# Altium PCB PWR Board 10A.PcbDoc (part 6 of 10)
Units mm, origin at the board's own origin, x right, y up, seen from the top; angles counter-clockwise.
Board outline 355 x 325 mm, 4 copper layers (Top Layer, Layer 1, Layer 2, Bottom Layer), stack 1.636 mm thick; 617 components, 308 nets, 1518 pads, 1199 vias.
Unrouted connection lines stored in the file: 361.
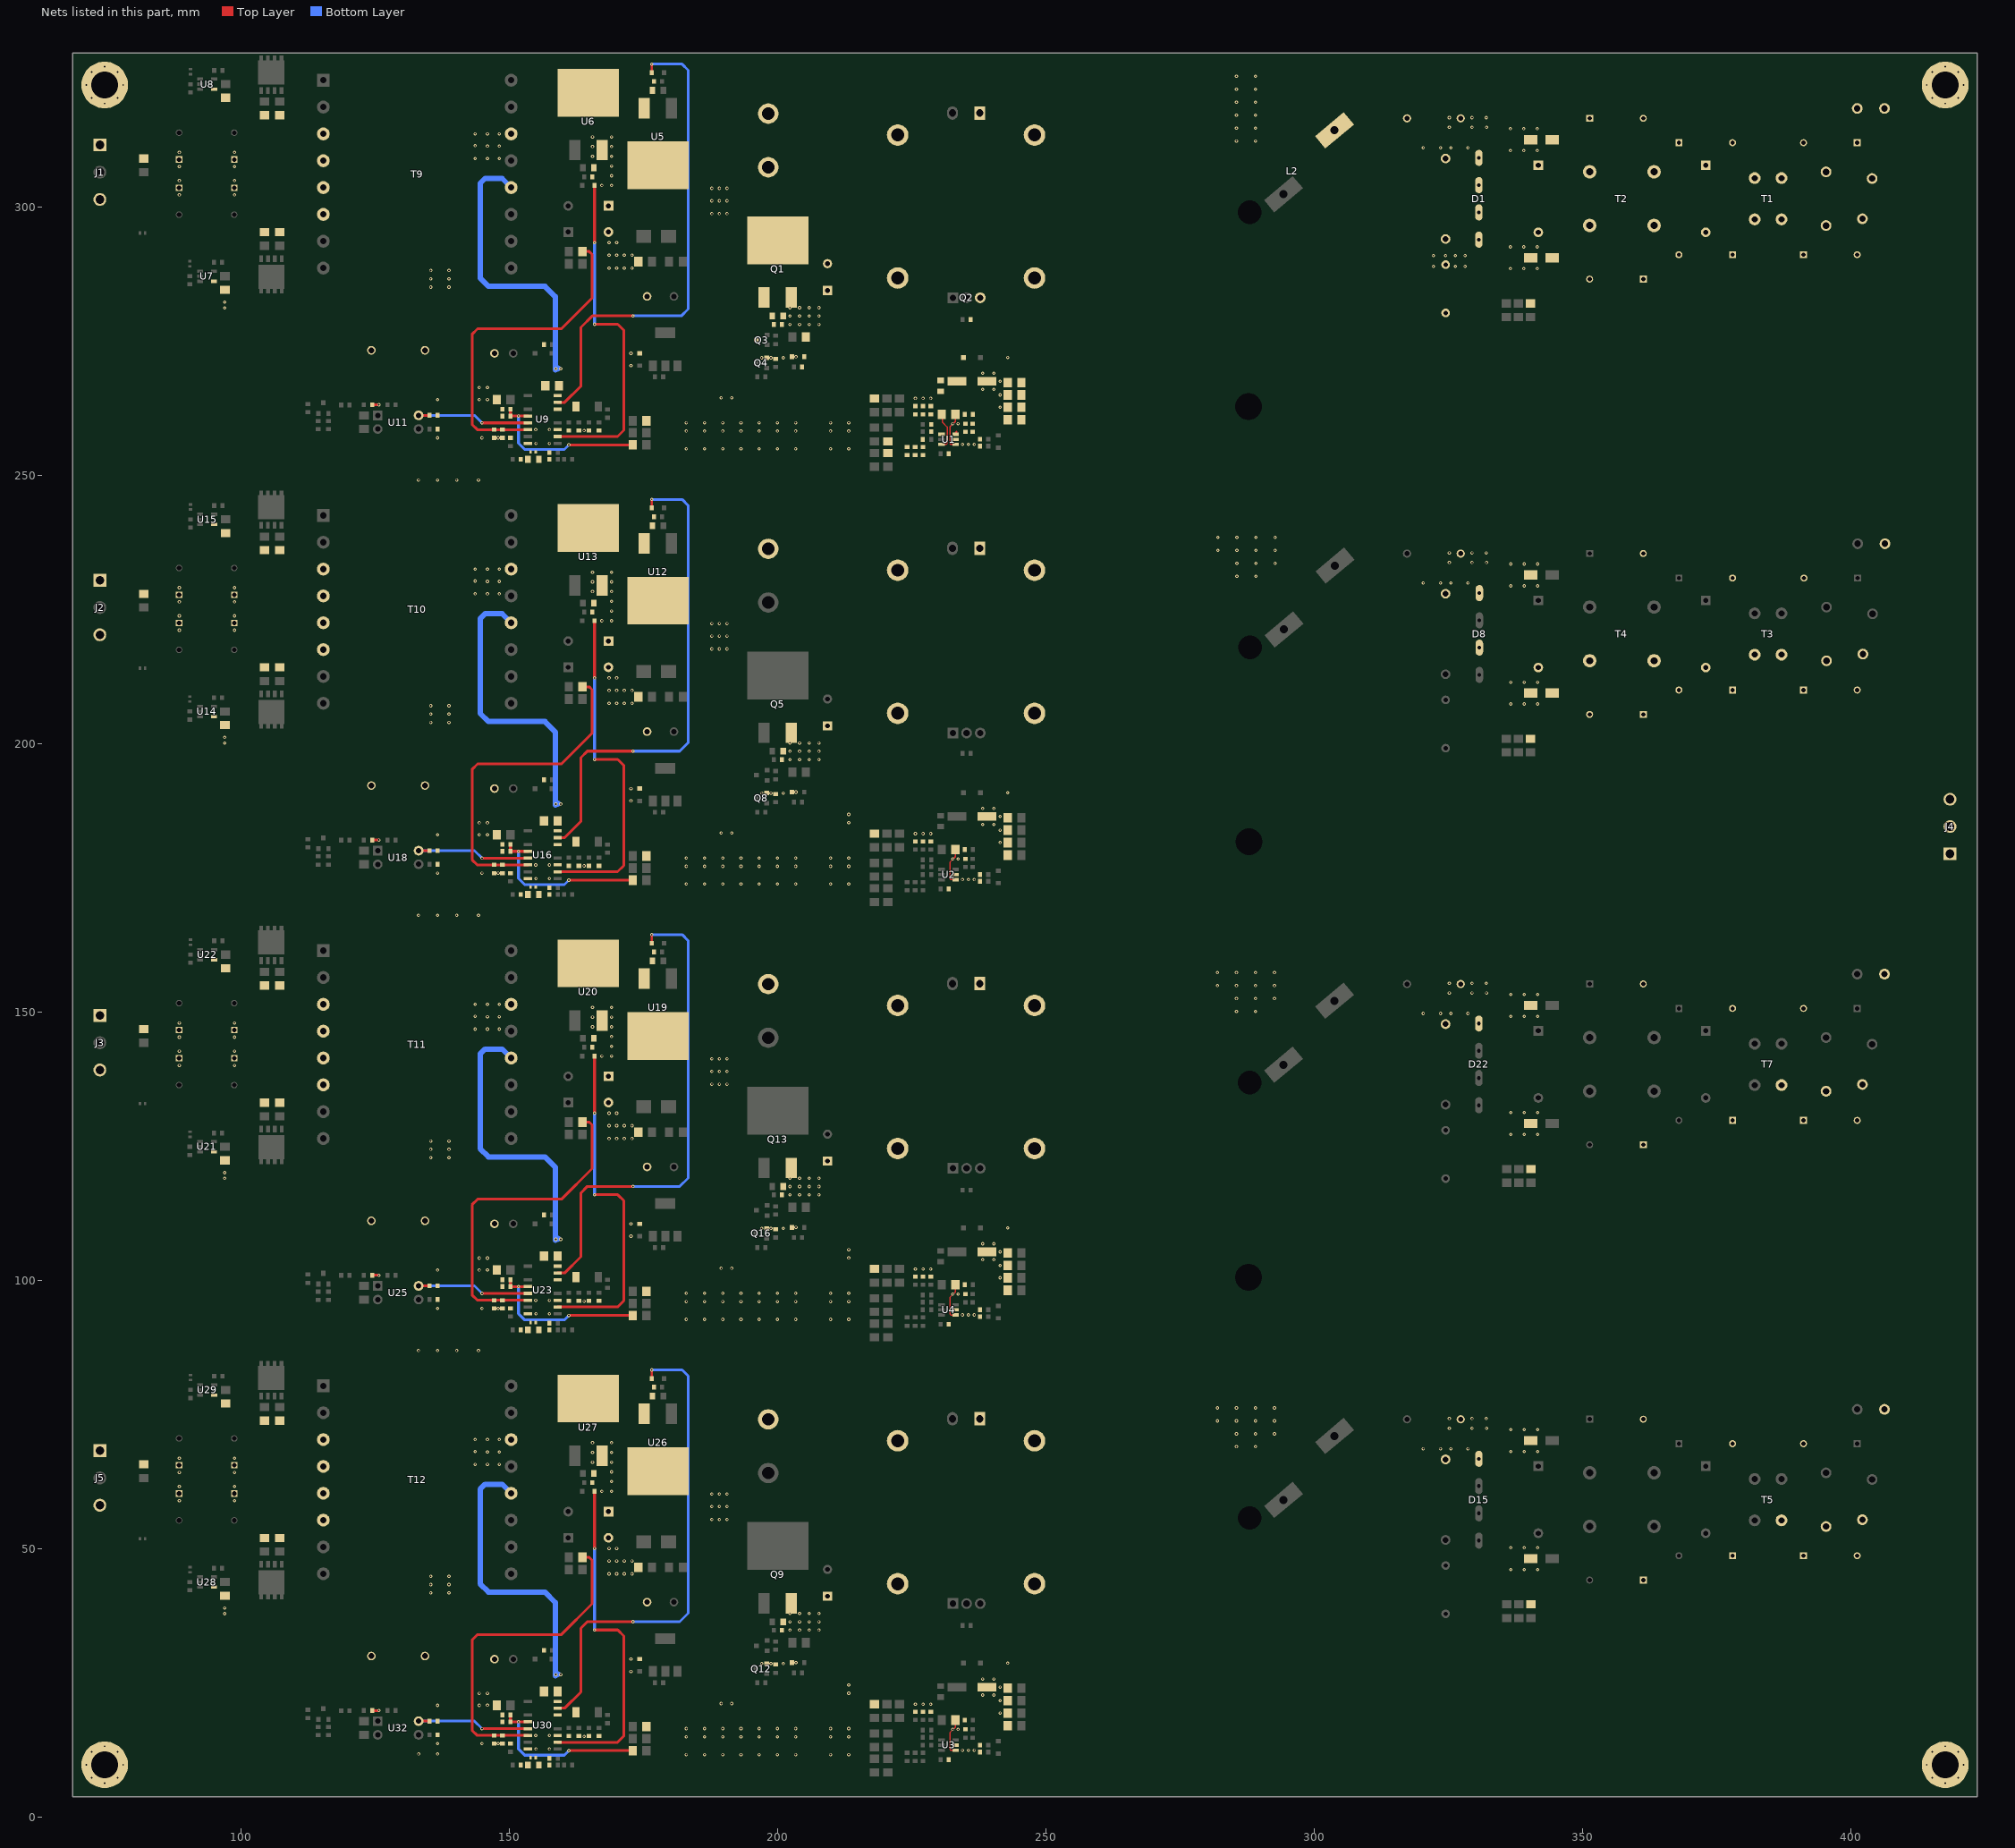
[diagram p4: the nets of this part, all layers, seen from the top]

## Via types
v1: diameter 0.6, hole 0.3, Top Layer to Bottom Layer, 1199 vias

## Nets (pads, with @x,y where several pads share a name; then routed paths per layer and width w, separated by ;. In a path a pad name is that pad's centre, name@x,y a point inside that pad or via, vN(x,y) a via of type N, cw(c..) or ccw(c..) an arc to the next point about the centre after c; other vN are vias at no path point) (continued)
GND: (continued)
  other v1: 183.007,11.583 186.402,11.583 189.797,11.583 193.192,11.583 196.588,11.583 199.983,11.583 203.378,11.583 209.88,11.583 213.275,11.583 133.121,11.684 136.652,11.684 234.467,12.402 235.572,12.402 236.677,12.402 155.01,12.605 157.512,12.605 136.652,13.621 144.932,13.621 147.947,13.621 183.007,14.884 186.402,14.884 189.797,14.884 193.192,14.884 196.588,14.884 199.983,14.884 203.378,14.884 209.88,14.884 213.275,14.884 163.957,14.967 154.94,15.145 157.512,15.145 232.689,16.268 233.657,16.268 183.007,16.434 186.402,16.434 189.797,16.434 193.192,16.434 196.588,16.434 199.983,16.434 203.378,16.434 209.88,16.434 213.275,16.434 241.503,19.318 136.652,20.758 144.424,20.758 145.948,20.777 225.696,20.967 227.124,20.967 228.552,20.967 241.503,21.63 238.252,22.68 240.33,22.68 144.424,22.987 145.948,22.987 213.275,23.012 241.503,24.167 213.275,24.562 238.252,25.654 240.33,25.654 172.695,27.081 201.068,28.534 197.055,28.538 198.78,28.538 242.917,28.612 203.454,28.731 172.695,29.381 202.311,34.77 204.114,34.77 205.918,34.77 207.721,34.77 202.311,36.319 204.114,36.319 205.918,36.319 207.721,36.319 202.311,37.869 204.114,37.869 205.918,37.869 207.721,37.869 135.382,41.707 138.777,41.707 135.382,43.256 138.777,43.256 135.382,44.806 138.777,44.806 168.605,45.263 170.028,45.263 171.45,45.263 172.872,45.263 168.605,47.663 170.028,47.663 171.45,47.663 172.872,47.663 168.605,49.988 170.028,49.988 167.259,60.648 169.062,60.648 169.062,62.458 169.062,64.268 143.648,65.667 145.951,65.667 148.158,65.667 165.528,66.078 169.062,66.078 165.528,67.887 169.062,67.887 145.951,67.97 148.158,67.97 143.648,68.066 320.344,68.58 323.545,68.58 325.476,68.58 328.676,68.58 285.536,68.936 289.078,68.936 165.528,69.697 169.062,69.697 143.648,70.273 145.951,70.273 148.158,70.273 285.536,71.349 289.078,71.349 292.62,71.349 325.201,72.39 329.438,72.39 332.13,72.39 281.994,73.762 285.536,73.762 289.078,73.762 292.62,73.762 325.201,74.193 329.438,74.193 332.08,74.193 281.994,76.175 285.536,76.175 289.078,76.175 292.62,76.175 133.096,86.868 136.652,86.868 140.208,86.868 144.272,86.868 183.007,92.686 186.402,92.686 189.797,92.686 193.192,92.686 196.588,92.686 199.983,92.686 203.378,92.686 209.88,92.686 213.275,92.686 234.467,93.504 235.572,93.504 236.677,93.504 155.01,93.707 157.512,93.707 136.652,94.723 144.932,94.723 147.947,94.723 183.007,95.987 186.402,95.987 189.797,95.987 193.192,95.987 196.588,95.987 199.983,95.987 203.378,95.987 209.88,95.987 213.275,95.987 163.957,96.07 154.94,96.247 157.512,96.247 232.689,97.37 233.657,97.37 183.007,97.536 186.402,97.536 189.797,97.536 193.192,97.536 196.588,97.536 199.983,97.536 203.378,97.536 209.88,97.536 213.275,97.536 241.503,100.421 136.652,101.86 144.424,101.861 145.948,101.879 225.696,102.069 227.124,102.069 228.552,102.069 241.503,102.732 238.252,103.783 240.33,103.783 144.424,104.089 145.948,104.089 213.275,104.115 241.503,105.269 213.275,105.664 238.252,106.756 240.33,106.756 172.695,108.183 201.068,109.636 197.055,109.64 198.78,109.64 242.917,109.714 203.454,109.833 172.695,110.483 202.311,115.872 204.114,115.872 205.918,115.872 207.721,115.872 202.311,117.422 204.114,117.422 205.918,117.422 207.721,117.422 202.311,118.971 204.114,118.971 205.918,118.971 207.721,118.971 135.382,122.809 138.777,122.809 135.382,124.359 138.777,124.359 135.382,125.908 138.777,125.908 168.605,126.366 170.028,126.366 171.45,126.366 172.872,126.366 168.605,128.766 170.028,128.766 171.45,128.766 172.872,128.766 168.605,131.09 170.028,131.09 167.259,141.75 169.062,141.75 169.062,143.56 169.062,145.37 143.648,146.769 145.951,146.769 148.158,146.769 165.528,147.18 169.062,147.18 165.528,148.99 169.062,148.99 145.951,149.072 148.158,149.072 143.648,149.169 320.344,149.682 323.545,149.682 325.476,149.682 328.676,149.682 285.536,150.038 289.078,150.038 165.528,150.8 169.062,150.8 143.648,151.375 145.951,151.375 148.158,151.375 285.536,152.451 289.078,152.451 292.62,152.451 325.201,153.492 329.438,153.492 332.13,153.492 281.994,154.864 285.536,154.864 289.078,154.864 292.62,154.864 325.201,155.296 329.438,155.296 332.08,155.296 281.994,157.277 285.536,157.277 289.078,157.277 292.62,157.277 133.096,167.97 136.652,167.97 140.208,167.97 144.272,167.97 183.007,173.788 186.402,173.788 189.797,173.788 193.192,173.788 196.588,173.788 199.983,173.788 203.378,173.788 209.88,173.788 213.275,173.788 234.467,174.607 235.572,174.607 236.677,174.607 155.01,174.81 157.512,174.81 136.652,175.825 144.932,175.826 147.947,175.826 183.007,177.089 186.402,177.089 189.797,177.089 193.192,177.089 196.588,177.089 199.983,177.089 203.378,177.089 209.88,177.089 213.275,177.089 163.957,177.172 154.94,177.35 157.512,177.35 232.689,178.472 233.657,178.472 183.007,178.638 186.402,178.638 189.797,178.638 193.192,178.638 196.588,178.638 199.983,178.638 203.378,178.638 209.88,178.638 213.275,178.638 241.503,181.523 136.652,182.963 144.424,182.963 145.948,182.981 225.696,183.171 227.124,183.171 228.552,183.171 241.503,183.834 238.252,184.885 240.33,184.885 144.424,185.191 145.948,185.191 213.275,185.217 241.503,186.372 213.275,186.766 238.252,187.858 240.33,187.858 172.695,189.286 201.068,190.739 197.055,190.742 198.78,190.742 242.917,190.817 203.454,190.935 172.695,191.586 202.311,196.975 204.114,196.975 205.918,196.975 207.721,196.975 202.311,198.524 204.114,198.524 205.918,198.524 207.721,198.524 202.311,200.074 204.114,200.074 205.918,200.074 207.721,200.074 135.382,203.911 138.777,203.911 135.382,205.461 138.777,205.461 135.382,207.01 138.777,207.01 168.605,207.468 170.028,207.468 171.45,207.468 172.872,207.468 168.605,209.868 170.028,209.868 171.45,209.868 172.872,209.868 168.605,212.192 170.028,212.192 167.259,222.853 169.062,222.853 169.062,224.663 169.062,226.472 143.648,227.872 145.951,227.872 148.158,227.872 165.528,228.282 169.062,228.282 320.344,229.881 323.545,229.881 325.476,229.881 328.676,229.881 165.528,230.092 169.062,230.092 145.951,230.175 148.158,230.175 143.648,230.271 285.623,231.14 289.165,231.14 165.528,231.902 169.062,231.902 143.648,232.478 145.951,232.478 148.158,232.478 285.623,233.553 289.165,233.553 292.707,233.553 325.201,233.691 329.438,233.691 332.13,233.691 325.201,235.494 329.438,235.494 332.08,235.494 282.081,235.966 285.623,235.966 289.165,235.966 292.707,235.966 282.081,238.379 285.623,238.379 289.165,238.379 292.707,238.379 133.096,249.073 136.652,249.073 140.208,249.073 144.272,249.073 183.007,254.89 186.402,254.89 189.797,254.89 193.192,254.89 196.588,254.89 199.983,254.89 203.378,254.89 209.88,254.89 213.275,254.89 234.467,255.709 235.572,255.709 236.677,255.709 155.01,255.912 157.512,255.912 136.652,256.928 144.932,256.928 147.947,256.928 183.007,258.191 186.402,258.191 189.797,258.191 193.192,258.191 196.588,258.191 199.983,258.191 203.378,258.191 209.88,258.191 213.275,258.191 163.957,258.274 154.94,258.452 157.512,258.452 232.689,259.575 233.657,259.575 183.007,259.741 186.402,259.741 189.797,259.741 193.192,259.741 196.588,259.741 199.983,259.741 203.378,259.741 209.88,259.741 213.275,259.741 241.503,262.625 136.652,264.065 144.424,264.065 145.948,264.084 225.696,264.274 227.124,264.274 228.552,264.274 241.503,264.937 238.252,265.988 240.33,265.988 144.424,266.294 145.948,266.294 241.503,267.474 238.252,268.961 240.33,268.961 172.695,270.388 201.068,271.841 197.055,271.845 198.78,271.845 242.917,271.919 203.454,272.038 172.695,272.688 202.311,278.077 204.114,278.077 205.918,278.077 207.721,278.077 202.311,279.626 204.114,279.626 205.918,279.626 207.721,279.626 202.311,281.176 204.114,281.176 205.918,281.176 207.721,281.176 135.382,285.014 138.777,285.014 135.382,286.563 138.777,286.563 135.382,288.113 138.777,288.113 168.605,288.57 170.028,288.57 171.45,288.57 172.872,288.57 168.605,290.97 170.028,290.97 171.45,290.97 172.872,290.97 168.605,293.295 170.028,293.295 167.259,303.955 169.062,303.955 169.062,305.765 169.062,307.575 143.648,308.974 145.951,308.974 148.158,308.974 165.528,309.385 169.062,309.385 320.344,310.984 323.545,310.984 325.476,310.984 328.676,310.984 165.528,311.194 169.062,311.194 145.951,311.277 148.158,311.277 143.648,311.373 285.536,312.243 289.078,312.243 165.528,313.004 169.062,313.004 143.648,313.58 145.951,313.58 148.158,313.58 285.536,314.656 289.078,314.656 325.201,314.794 329.438,314.794 332.13,314.794 325.201,316.597 329.438,316.597 332.08,316.597 285.536,317.069 289.078,317.069 285.536,319.482 289.078,319.482 285.536,321.895 289.078,321.895 285.536,324.308 289.078,324.308
H_V-C1: C12.1 C94.1 D4.1 R1.2 R121.2 U5.2
  other v1: 189.509,264.395 191.465,264.395 187.757,298.704 189.179,298.704 190.602,298.704 187.757,301.104 189.179,301.104 190.602,301.104 187.757,303.428 189.179,303.428 190.602,303.428
H_V-C2: C35.1 C129.1 D11.1 R27.2 R151.2 U12.2
  other v1: 189.509,183.292 191.465,183.292 187.757,217.602 189.179,217.602 190.602,217.602 187.757,220.002 189.179,220.002 190.602,220.002 187.757,222.326 189.179,222.326 190.602,222.326
H_V-C3: C81.1 C164.1 D25.1 R79.2 R181.2 U19.2
  other v1: 189.509,102.19 191.465,102.19 187.757,136.499 189.179,136.499 190.602,136.499 187.757,138.899 189.179,138.899 190.602,138.899 187.757,141.224 189.179,141.224 190.602,141.224
H_V-C4: C58.1 C199.1 D18.1 R53.2 R211.2 U26.2
  other v1: 189.509,21.088 191.465,21.088 187.757,55.397 189.179,55.397 190.602,55.397 187.757,57.797 189.179,57.797 190.602,57.797 187.757,60.121 189.179,60.121 190.602,60.121
HB-C1: C113.1 D33.1 U9.14
HB-C2: C148.1 D39.1 U16.14
HB-C3: C183.1 D45.1 U23.14
HB-C4: C218.1 D51.1 U30.14
HO-C1: D29.1 R105.1 U9.15 | length 91.3
  Top Layer w0.381: D29.1@176.574,324.975 v1(176.574,326.568)
  Top Layer w0.508: U9.15@159.036,263.532 160.331,263.532 163.347,266.549 163.347,277.508 165.493,279.654 v1(173.076,279.654)
  Bottom Layer w0.508: v1(173.076,279.654) 182.093,279.654 183.365,280.926 183.365,325.423 182.22,326.568 v1(176.574,326.568)
HO-C2: D35.1 R135.1 U16.15 | length 91.7
  Top Layer w0.381: D35.1@176.574,243.872 v1(176.574,245.465)
  Top Layer w0.508: U16.15@159.036,182.43 160.331,182.43 163.347,185.446 163.347,197.332 164.567,198.552 v1(173.076,198.552)
  Bottom Layer w0.508: v1(173.076,198.552) 181.788,198.552 183.365,200.129 183.365,244.32 182.22,245.465 v1(176.574,245.465)
HO-C3: D41.1 R165.1 U23.15 | length 91.7
  Top Layer w0.381: D41.1@176.574,162.77 v1(176.574,164.363)
  Top Layer w0.508: U23.15@159.036,101.327 160.331,101.327 163.347,104.344 163.347,116.23 164.567,117.449 v1(173.076,117.449)
  Bottom Layer w0.508: v1(173.076,117.449) 181.788,117.449 183.365,119.026 183.365,163.218 182.22,164.363 v1(176.574,164.363)
HO-C4: D47.1 R195.1 U30.15 | length 91.7
  Top Layer w0.381: D47.1@176.574,81.668 v1(176.574,83.261)
  Top Layer w0.508: U30.15@159.036,20.225 160.331,20.225 163.347,23.242 163.347,35.128 164.567,36.347 v1(173.076,36.347)
  Bottom Layer w0.508: v1(173.076,36.347) 181.788,36.347 183.365,37.924 183.365,82.116 182.22,83.261 v1(176.574,83.261)
HS-C1: C113.2 R106.2 T9.12 U5.3 U6.2 U9.16 | length 54.1
  Bottom Layer w1: T9.12@150.365,303.58 148.688,305.257 145.517,305.257 144.602,304.343 144.602,286.696 146.135,285.163 156.67,285.163 158.601,283.233 158.601,269.615 v1@158.589,269.603 ; v1(158.699,269.799) 159.009,269.799 159.144,269.934
  other v1: 159.614,269.799
HS-C2: C148.2 R136.2 T10.12 U12.3 U13.2 U16.16 | length 54.1
  Bottom Layer w1: T10.12@150.365,222.478 148.688,224.155 145.517,224.155 144.602,223.24 144.602,205.594 146.135,204.061 156.67,204.061 158.601,202.13 158.601,188.512 v1@158.589,188.501 ; v1(158.699,188.696) 159.009,188.696 159.144,188.831
  other v1: 159.614,188.696
HS-C3: C183.2 R166.2 T11.12 U19.3 U20.2 U23.16 | length 54.1
  Bottom Layer w1: T11.12@150.365,141.375 148.688,143.053 145.517,143.053 144.602,142.138 144.602,124.492 146.135,122.959 156.67,122.959 158.601,121.028 158.601,107.41 v1@158.589,107.398 ; v1(158.699,107.594) 159.009,107.594 159.144,107.729
  other v1: 159.614,107.594
HS-C4: C218.2 R196.2 T12.12 U26.3 U27.2 U30.16 | length 54.1
  Bottom Layer w1: T12.12@150.365,60.273 148.688,61.95 145.517,61.95 144.602,61.036 144.602,43.389 146.135,41.856 156.67,41.856 158.601,39.925 158.601,26.308 v1@158.589,26.296 ; v1(158.699,26.492) 159.009,26.492 159.144,26.627
  other v1: 159.614,26.492
HV_S-C1: D2.1 D3.1 R117.1
  other v1: 336.579,288.442 339.079,288.442 341.579,288.442 336.579,292.518 339.079,292.518 341.579,292.518 336.579,310.452 339.079,310.452 341.579,310.452 336.579,314.528 339.079,314.528 341.579,314.528
HV_S-C2: D9.1 D10.1 R147.1
  other v1: 336.666,207.339 339.166,207.339 341.666,207.339 336.666,211.415 339.166,211.415 341.666,211.415 336.666,229.349 339.166,229.349 341.666,229.349 336.666,233.425 339.166,233.425 341.666,233.425
HV_S-C3: D23.1 D24.1 R177.1
  other v1: 336.666,127.139 339.166,127.139 341.666,127.139 336.666,131.215 339.166,131.215 341.666,131.215 336.666,149.15 339.166,149.15 341.666,149.15 336.666,153.226 339.166,153.226 341.666,153.226
HV_S-C4: D16.1 D17.1 R207.1
  other v1: 336.666,46.037 339.166,46.037 341.666,46.037 336.666,50.113 339.166,50.113 341.666,50.113 336.666,68.048 339.166,68.048 341.666,68.048 336.666,72.124 339.166,72.124 341.666,72.124
ISNS-C1: C103.1 C121.2 R125.2 U9.6 | length 62.9
  Top Layer w0.508: U9.6@153.486,258.452 C121.2@148.713,258.452 R125.2@147.189,258.452 144.059,258.452 143.096,259.415 143.096,276.248 144.114,277.266 159.748,277.266 165.455,282.973 165.455,291.117 164.925,291.647 C103.1@163.649,291.647
ISNS-C2: C138.1 C156.2 R155.2 U16.6 | length 62.9
  Top Layer w0.508: U16.6@153.486,177.35 148.713,177.35 147.189,177.35 144.059,177.35 143.096,178.313 143.096,195.146 144.114,196.164 159.748,196.164 165.455,201.871 165.455,210.015 164.925,210.544 C138.1@163.649,210.544
ISNS-C3: C173.1 C191.2 R185.2 U23.6 | length 62.9
  Top Layer w0.508: U23.6@153.486,96.247 C191.2@148.713,96.247 R185.2@147.189,96.247 144.059,96.247 143.096,97.211 143.096,114.043 144.114,115.062 159.748,115.062 165.455,120.768 165.455,128.912 164.925,129.442 C173.1@163.649,129.442
ISNS-C4: C208.1 C226.2 R215.2 U30.6 | length 62.9
  Top Layer w0.508: U30.6@153.486,15.145 C226.2@148.713,15.145 R215.2@147.189,15.145 144.059,15.145 143.096,16.108 143.096,32.941 144.114,33.959 159.748,33.959 165.455,39.666 165.455,47.81 164.925,48.34 C208.1@163.649,48.34
LO-C1: D31.1 R110.1 U9.10 | length 63.2
  Top Layer w0.508: U9.10@159.036,257.182 170.185,257.182 171.348,258.345 171.348,276.987 170.231,278.105 v1(165.913,278.105) ; v1(165.905,293.295) D31.1@165.905,303.955
  Bottom Layer w0.508: v1@165.905,278.105 v1(165.905,293.295)
LO-C2: D37.1 R140.1 U16.10 | length 63.2
  Top Layer w0.508: U16.10@159.036,176.08 170.185,176.08 171.348,177.243 171.348,195.885 170.231,197.002 v1(165.913,197.002) ; v1(165.905,212.192) D37.1@165.905,222.853
  Bottom Layer w0.508: v1@165.905,197.002 v1(165.905,212.192)
LO-C3: D43.1 R170.1 U23.10 | length 63.2
  Top Layer w0.508: U23.10@159.036,94.977 170.185,94.977 171.348,96.141 171.348,114.782 170.231,115.9 v1(165.913,115.9) ; v1(165.905,131.09) D43.1@165.905,141.75
  Bottom Layer w0.508: v1@165.905,115.9 v1(165.905,131.09)
LO-C4: D49.1 R200.1 U30.10 | length 63.2
  Top Layer w0.508: U30.10@159.036,13.875 170.185,13.875 171.348,15.038 171.348,33.68 170.231,34.798 v1(165.913,34.798) ; v1(165.905,49.988) D49.1@165.905,60.648
  Bottom Layer w0.508: v1@165.905,34.798 v1(165.905,49.988)
NetC2_2: C2.2 C7.2 T1.4 T2.1
NetC3_2: C3.2 C8.2 D1.2 D3.2 T2.4
NetC4_2: C4.2 D1.1 L1.1
  other v1: 322.224,288.9 326.339,288.9 328.137,288.9 322.224,290.893 324.51,290.893 326.339,290.893 328.137,290.893
NetC5_2: C5.2 L1.2 L2.1
NetC6_1: C6.1 C11.1 F1.2 T1.2 VR1.1
NetC7_1: C7.1 C9.1 T1.3 T2.2
NetC8_1: C8.1 C10.1 D1.3 D2.2 T2.3
NetC12_2: C12.2 Q1.2 RT1.2
NetC13_2: C13.2 Q1.1 Q3.3 R2.2
NetC14_1: C14.1 C15.2 C16.2 R10.1 R13.1 R15.2
NetC15_1: C15.1 C16.1 Q2.3 R9.2 R15.1 R21.1 R22.1 R23.2 R24.2
NetC17_1: C17.1 D7.1 R19.2
NetC18_2: C18.2 C19.2 U1.6 | length 0.3
  Top Layer w0.381: U1.6@233.189,257.865 233.375,258.051
NetC19_1: C19.1 R20.2 | length 0.1
  Top Layer w0.381: C19.1@236.356,259.575 C19.1@236.394,259.613 ; R20.2@236.394,261.289 R20.2@236.432,261.327
NetC20_2: C20.2 R14.2 U1.3 | length 7
  Top Layer w0.254: U1.3@230.569,255.709 231.415,255.709 231.619,255.912 231.619,258.953 230.762,259.81 230.762,261.175 C20.2@230.609,261.327
NetC21_1: C21.1 D6.2 R14.1
NetC22_2: C22.2 R11.1 R12.1 R17.2 R18.2 U1.1
NetC25_2: C25.2 C30.2 T3.4 T4.1
NetC26_2: C26.2 C31.2 D8.2 D10.2 T4.4